# EAGLE board autonomous-rc-car (EAGLE 9.7.0)

Size 178.98 x 190.36 mm. Coordinates in mm from the lower left corner, seen from the top.
Outline: 0,0 178.98,0 178.98,190.36 0,190.36 0,0
Copper layers (1*16): Top 0.035mm / dielectric 1.5mm / Bottom 0.035mm
Design rules "default": minimum track width 6mil, minimum drill 0.35mm, track to track 6mil, track to pad 6mil, pad to pad 6mil, via to via 6mil, smd to smd 6mil, copper to edge 40mil, drill to drill 6mil, minimum pad ring 10mil, minimum via ring 8mil, stop-mask expansion 4mil, vias tented up to drill 0mil, thermal gap 10mil

## Footprints (pad centres in the part's own frame; a part is rotated, then mirrored left to right if it is on the bottom)
LEDRD254W60D565H860B = drill 0.981 pad 1.581: 1 -1.27,0; 2 1.27,0
HC-SR04 = drill 1.016 long: 1 -3.81,0; 2 -1.27,0; 3 1.27,0; 4 3.81,0
DG01D = drill 1.118 pad 3.15 octagon: + 2.54,0; - -2.54,0
GL5528 = drill 0.8 pad 1.4: 1 -1.702,0; 2 1.702,0
RESAD1016W63L850D250B = drill 0.83 pad 1.43: 1 -5.08,0; 2 5.08,0
ARDUINO-UNO-R3-SHIELD = drill 1.016 pad 1.88: 3.3V 24.13,-2.54; 5V 24.13,0; A0 24.13,12.7; A1 24.13,15.24; A2 24.13,17.78; A3 24.13,20.32; A4 24.13,22.86; A5 24.13,25.4; AREF -24.13,-13.97; D2 -24.13,20.32; D3 -24.13,17.78; D4 -24.13,15.24; D5 -24.13,12.7; D6 -24.13,10.16; D7 -24.13,7.62; D8 -24.13,3.81; D9 -24.13,1.27; D10 -24.13,-1.27; D11 -24.13,-3.81; D12 -24.13,-6.35; D13 -24.13,-8.89; GND@0 24.13,2.54; GND@1 24.13,5.08; GND@2 -24.13,-11.43; IOREF 24.13,-7.62; NC 24.13,-10.16; RES 24.13,-5.08; RX -24.13,25.4; SCL -24.13,-19.05; SDA -24.13,-16.51; TX -24.13,22.86; VIN 24.13,7.62
DIP762W53P254L1969H508Q16B = drill 0.743 pad 1.343: 1 -3.81,8.89; 2 -3.81,6.35; 3 -3.81,3.81; 4 -3.81,1.27; 5 -3.81,-1.27; 6 -3.81,-3.81; 7 -3.81,-6.35; 8 -3.81,-8.89; 9 3.81,-8.89; 10 3.81,-6.35; 11 3.81,-3.81; 12 3.81,-1.27; 13 3.81,1.27; 14 3.81,3.81; 15 3.81,6.35; 16 3.81,8.89
TSOP48 = drill 0.8: 1 -2.54,0; 2 0,0; 3 2.54,0

## Placement (x,y rotation side)
D1  RED  [LEDRD254W60D565H860B]  47.57,182.45 180 top
D2  RED  [LEDRD254W60D565H860B]  37.41,162.13 180 top
DIST1  DISTANCE-SENSOR-4PINHC-SR04  [HC-SR04]  152.95,118.13 0 top
MЛЕВЫЙ_МОТОР  MOTOR_DG01D  [DG01D]  12.7,74.3 0 top
MПРАВЫЙ_МОТОР  MOTOR_DG01D  [DG01D]  54.69,40.71 90 top
R1  PHOTOCELL_GL5528  [GL5528]  80.59,182.45 0 top
R2  PHOTOCELL_GL5528  [GL5528]  80.59,159.59 0 top
R3  1k  [RESAD1016W63L850D250B]  86.94,157.05 0 top
R4  1k  [RESAD1016W63L850D250B]  86.94,179.91 0 top
R5  1k  [RESAD1016W63L850D250B]  53.92,179.91 0 top
R6  1k  [RESAD1016W63L850D250B]  43.76,157.05 0 top
U1  ARDUINO-UNO-R3-SHIELD  [ARDUINO-UNO-R3-SHIELD]  65.37,106.96 270 top
U2  L293E  [DIP762W53P254L1969H508Q16B]  62.46,55.54 90 top
U3  IR-RECEIVERTSOP48  [TSOP48]  61.54,157.05 0 top

## Library data of the parts
D1 D2 = Tinkercad; CATEGORY: Opto-Electronic; SUB-CATEGORY: LED; VALUE: LED_RED
DIST1 MЛЕВЫЙ_МОТОР MПРАВЫЙ_МОТОР R1-R6 U1-U3 = Tinkercad

## Nets
D1_A: D1.1 R5.1
D2_A: D2.1 R6.1
MЛЕВЫЙ_МОТОР_+: MЛЕВЫЙ_МОТОР.+ U2.11
MЛЕВЫЙ_МОТОР_-: MЛЕВЫЙ_МОТОР.- U2.14
MПРАВЫЙ_МОТОР_+: MПРАВЫЙ_МОТОР.+ U2.3
MПРАВЫЙ_МОТОР_-: MПРАВЫЙ_МОТОР.- U2.6
U1_5V: DIST1.1 R3.2 R4.2 U1.5V U2.8 U2.16 U3.3
U1_A0: R2.2 R3.1 U1.A0
U1_A1: R1.2 R4.1 U1.A1
U1_D2: U1.D2 U2.7
U1_D3: U1.D3 U2.2
U1_D4: U1.D4 U2.1
U1_D5: U1.D5 U2.15
U1_D6: U1.D6 U2.10
U1_D7: DIST1.3 U1.D7
U1_D8: DIST1.2 U1.D8
U1_D9: U1.D9 U2.9
U1_D11: U1.D11 U3.1
U1_D12: R5.2 U1.D12
U1_D13: R6.2 U1.D13
U1_GND: D1.2 D2.2 DIST1.4 R1.1 R2.1 U1.GND@0 U1.GND@1 U1.GND@2 U2.5 U2.13 U3.2

## Tracks (layer width: path | path; a pad name or v marks a point on that pad's centre or on a via)
D1_A  (1 unrouted)
D2_A  (1 unrouted)
MЛЕВЫЙ_МОТОР_+  (1 unrouted)
MЛЕВЫЙ_МОТОР_-  (1 unrouted)
MПРАВЫЙ_МОТОР_+  (1 unrouted)
MПРАВЫЙ_МОТОР_-  (1 unrouted)
U1_5V  (6 unrouted)
U1_A0  (2 unrouted)
U1_A1  (2 unrouted)
U1_D2  (1 unrouted)
U1_D3  (1 unrouted)
U1_D4  (1 unrouted)
U1_D5  (1 unrouted)
U1_D6  (1 unrouted)
U1_D7  (1 unrouted)
U1_D8  (1 unrouted)
U1_D9  (1 unrouted)
U1_D11  (1 unrouted)
U1_D12  (1 unrouted)
U1_D13  (1 unrouted)
U1_GND  (10 unrouted)